# Altium PCB Keyboard_V0.1.PcbDoc (part 1 of 4)
Units mil, origin at the board's own origin, x right, y up, seen from the top; angles counter-clockwise.
Board outline 5480.32 x 4193.11 mil, 2 copper layers (Top Layer, Bottom Layer); 162 components, 142 nets, 755 pads, 487 vias.
Unrouted connection lines stored in the file: 1.
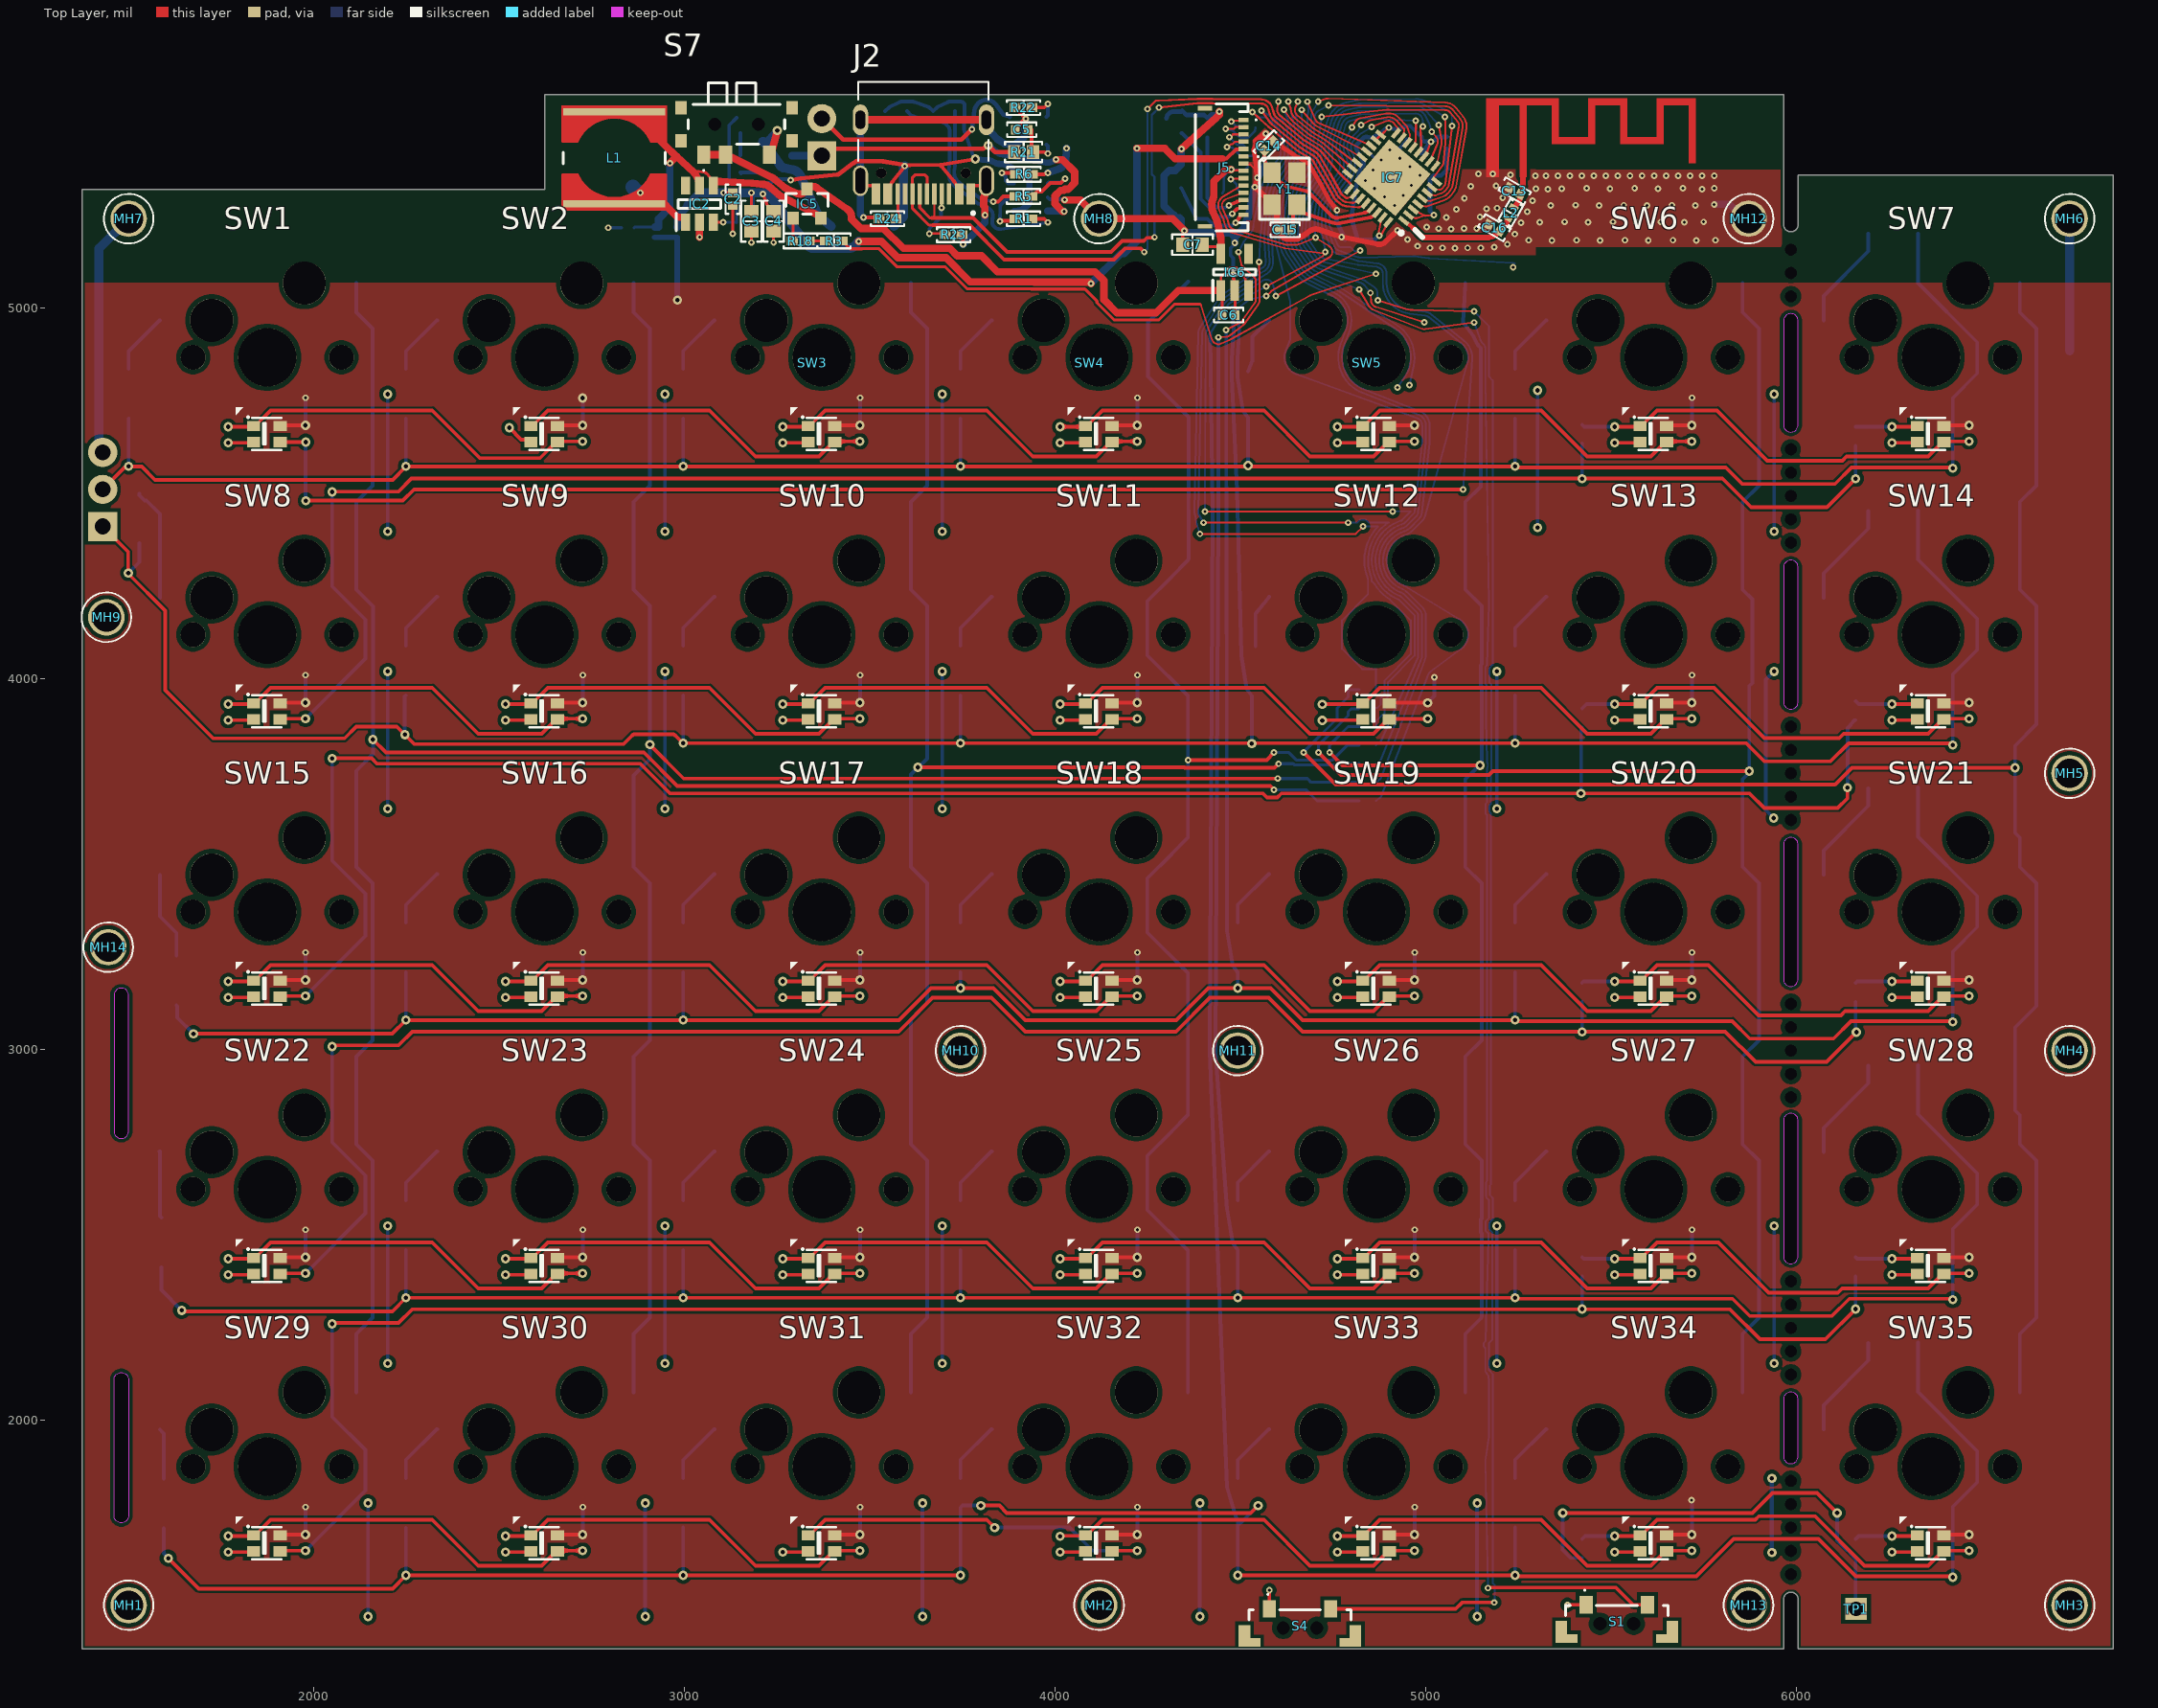
[diagram p0: Top Layer view]
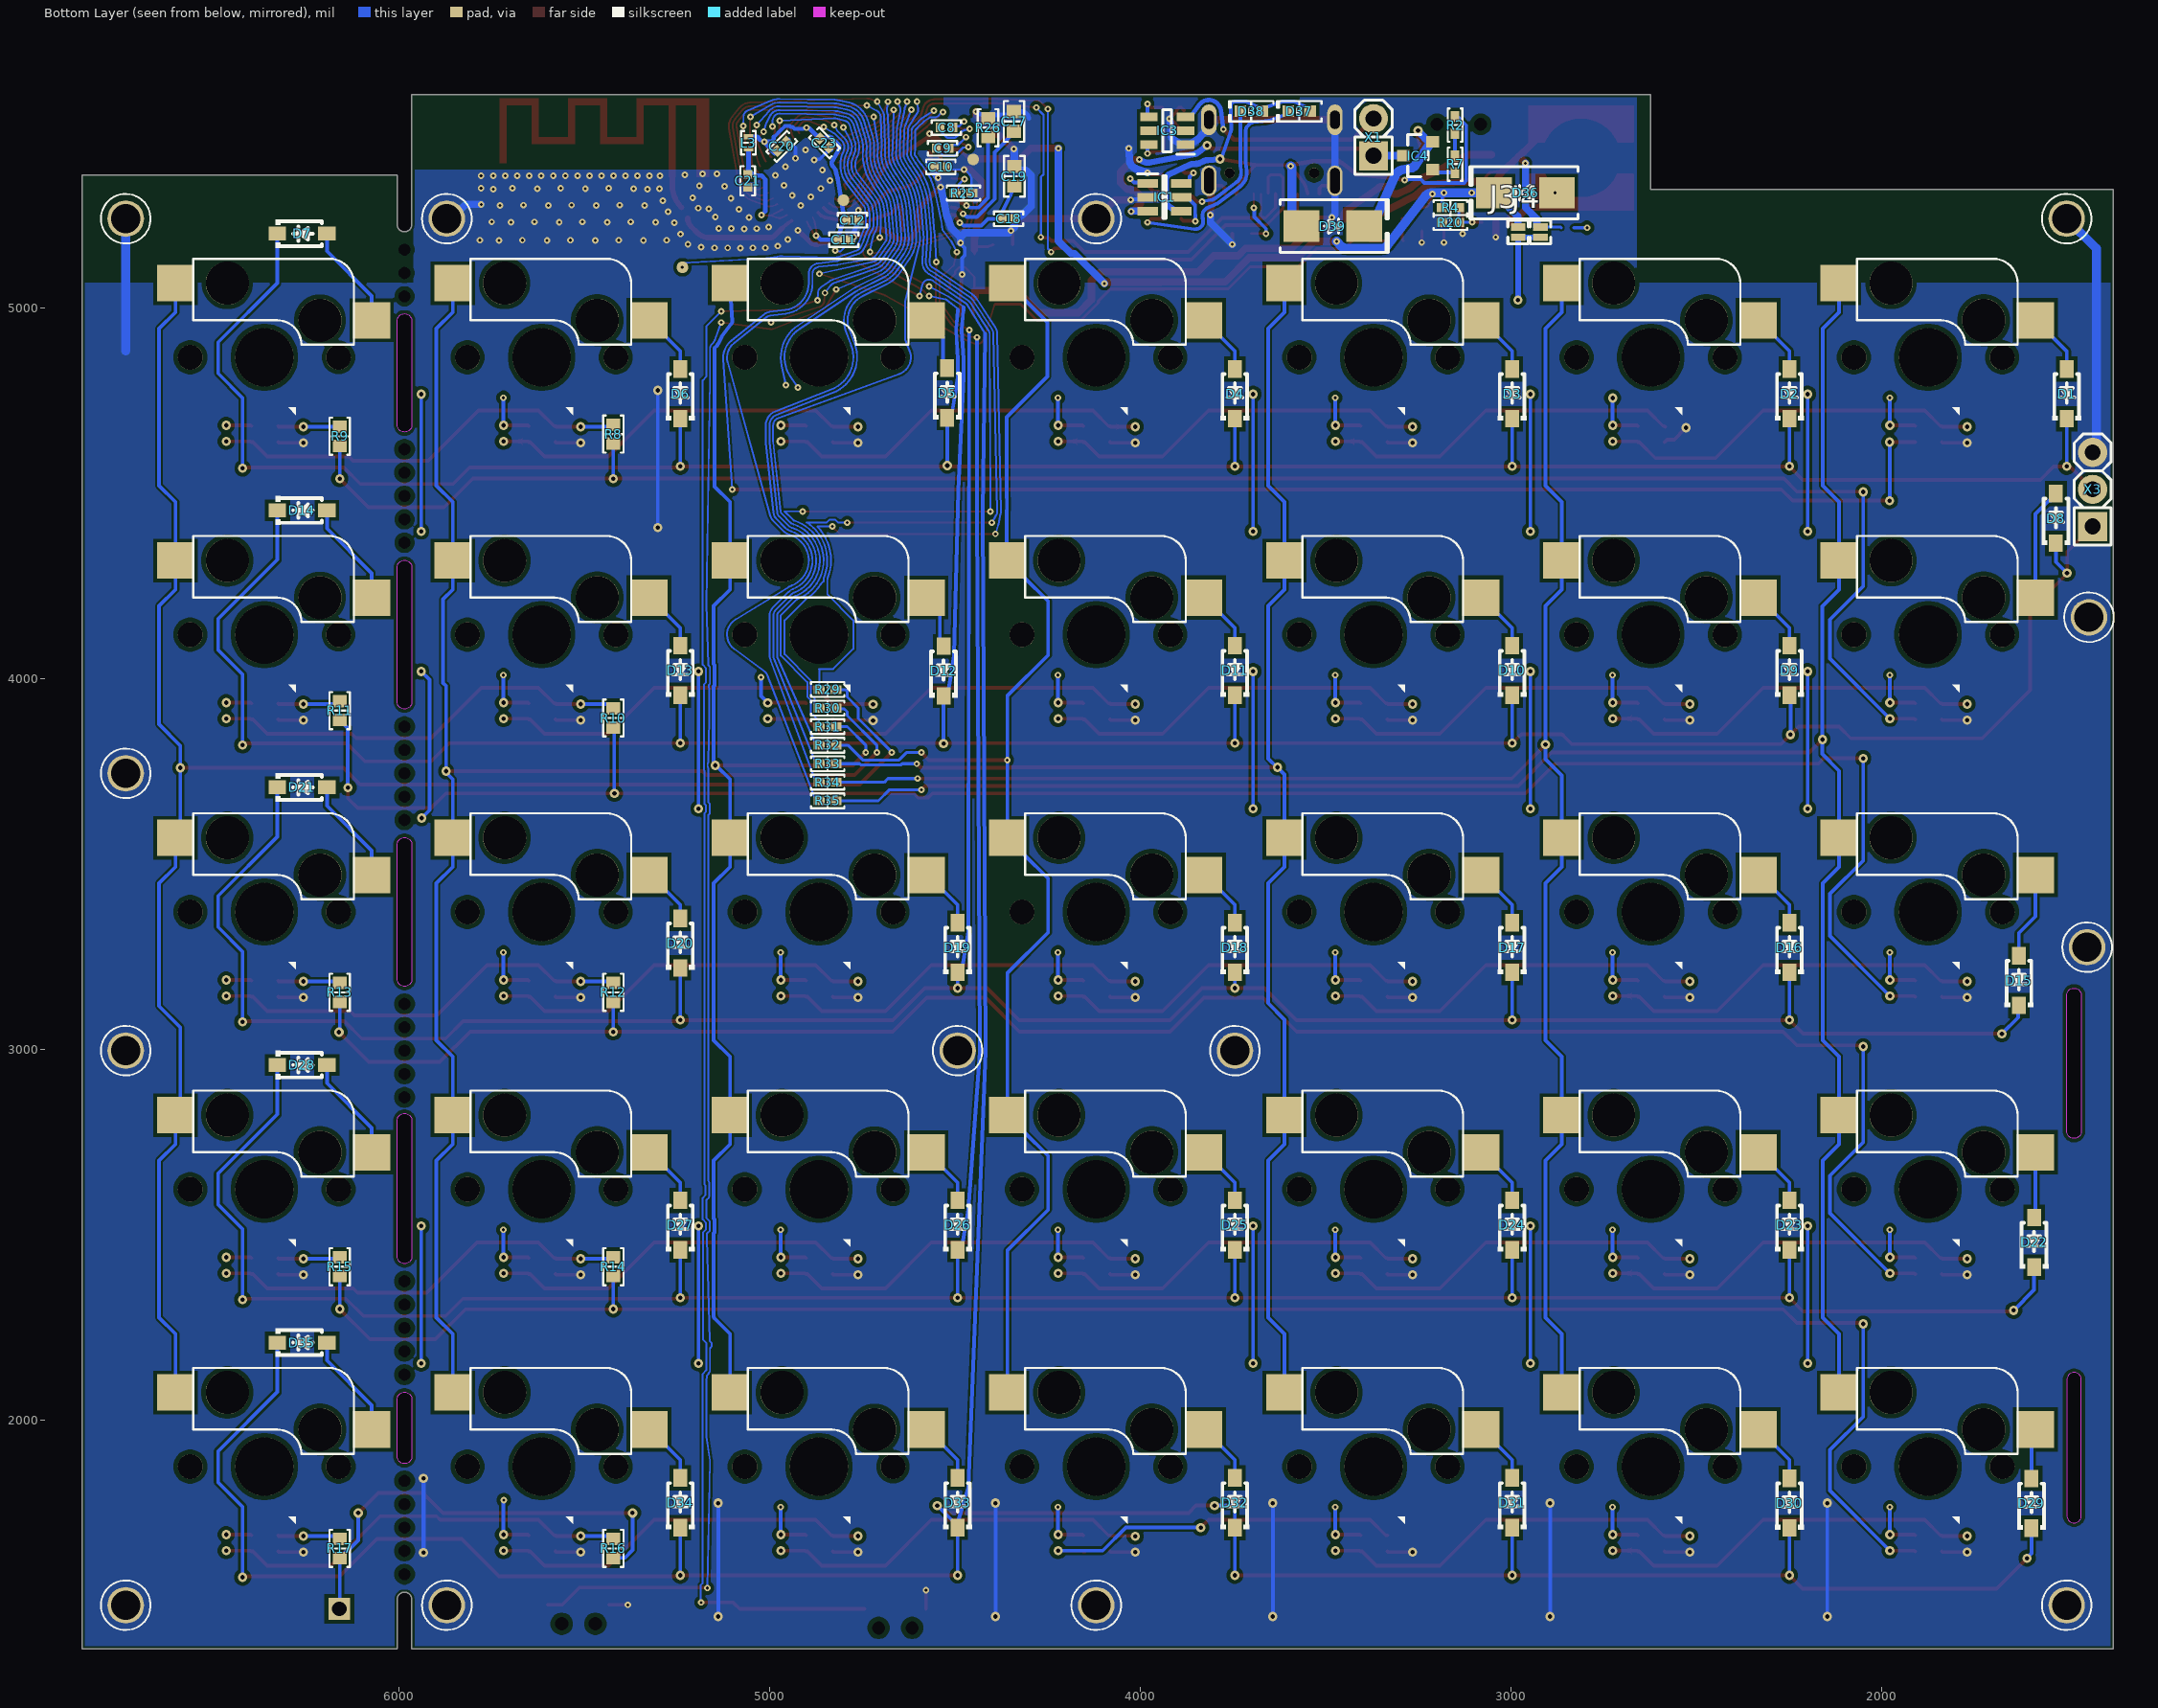
[diagram p1: Bottom Layer view, seen from below]

## Layer stack, top to bottom
Top Solder: solder mask 0.4, Solder Resist, Dk 3.5
Top Layer: signal copper 1.4
Dielectric 1: dielectric 12.6, FR-4, Dk 4.8
Bottom Layer: signal copper 1.4
Bottom Solder: solder mask 0.4, Solder Resist, Dk 3.5

## Board outline
1374.02,1381.89 5964.57,1381.89 5964.57,1515.75 cw(c5984.25,1515.75) 6003.94,1515.75 6003.94,1381.89 6854.33,1381.89 6854.33,5358.27 6003.94,5358.27 6003.94,5224.41 cw(c5984.25,5224.41) 5964.57,5224.41 5964.57,5575 2622.24,5575 2622.24,5319.09 1374.02,5319.09
cut-out: 5964.57,4683.79 ccw(c5983.9,4683.79) 5983.9,4664.46 ccw(c5983.9,4684.5) 6003.94,4684.5 6003.94,4964.22 ccw(c5984.26,4964.22) 5984.26,4983.9 5983.9,4983.9 ccw(c5983.9,4964.57) 5964.57,4964.57
cut-out: 5964.57,1901.22 ccw(c5983.9,1901.22) 5983.9,1881.89 ccw(c5983.9,1901.93) 6003.94,1901.93 6003.94,2055.12 ccw(c5984.26,2055.12) 5984.26,2074.8 5983.9,2074.8 ccw(c5983.9,2055.47) 5964.57,2055.47
cut-out: 5964.57,2440.59 ccw(c5983.9,2440.59) 5983.9,2421.26 ccw(c5983.9,2441.3) 6003.94,2441.3 6003.94,2807.09 ccw(c5984.26,2807.09) 5984.26,2826.77 5983.9,2826.77 ccw(c5983.9,2807.44) 5964.57,2807.44 5964.57,2807.09
cut-out: 5964.57,3188.63 ccw(c5983.9,3188.63) 5983.9,3169.29 ccw(c5983.9,3189.33) 6003.94,3189.33 6003.94,3551.18 ccw(c5984.26,3551.18) 5984.26,3570.86 5983.9,3570.86 ccw(c5983.9,3551.53) 5964.57,3551.53 5964.57,3551.18
cut-out: 5964.57,3936.66 ccw(c5983.9,3936.66) 5983.9,3917.33 5984.26,3917.33 ccw(c5984.26,3937.01) 6003.94,3937.01 6003.94,4299.21 ccw(c5984.26,4299.21) 5984.26,4318.89 5983.9,4318.89 ccw(c5983.9,4299.56) 5964.57,4299.56
cut-out: 1460.63,2778.57 ccw(c1479.96,2778.51) 1479.96,2759.18 ccw(c1479.96,2779.21) 1500,2779.22 1500,3145 ccw(c1480.32,3145) 1480.14,3164.68 ccw(c1479.96,3145.35) 1460.63,3145.35
cut-out: 1460.63,2108.49 cw(c1479.96,2108.49) 1479.96,2127.82 cw(c1479.96,2107.78) 1500,2107.78 1500,1742.11 cw(c1480.32,1742) 1480.14,1722.32 cw(c1479.96,1741.65) 1460.63,1741.65 1460.63,1742

## Design rules (kind name [scope] priority, off if disabled: settings)
BoardOutlineClearance [All] p1: gap=10 ignorepadtopadclearanceinfootprint=FALSE except(0: Arc-SplitContinuation Track-SplitContinuation SMDPad-SplitContinuation THPad-SplitContinuation Via-SplitContinuation Fill-SplitContinuation Poly-SplitContinuation Region-SplitContinuation Text-SplitContinuation; 8: Track-OutlineEdge Fill-OutlineEdge Poly-OutlineEdge)
Clearance [All] p1: gap=6 ignorepadtopadclearanceinfootprint=FALSE except(5: Arc-Arc Arc-Track Arc-SMDPad Arc-Via Track-Track Track-SMDPad Track-Via; 10: SMDPad-Fill SMDPad-Poly SMDPad-Region THPad-Fill THPad-Poly THPad-Region Via-Fill Via-Poly Via-Region Fill-Fill Fill-Poly Fill-Region Poly-Poly Poly-Region Region-Region; 12: Arc-Hole Track-Hole SMDPad-Hole THPad-Hole Via-Hole Fill-Hole Poly-Hole Region-Hole Text-Hole)
PolygonConnect PolygonConnect_2 [All vs IsNamedPolygon('NONET_L02_P-001')] p1: connectstyle=Direct reliefconductorwidth=10 reliefentries=4 polygonreliefangle="90 Angle" airgapwidth=10
PolygonConnect PolygonConnect_1 [All vs IsNamedPolygon('NONET_L02_P-001')] p2: connectstyle=Direct reliefconductorwidth=10 reliefentries=4 polygonreliefangle="90 Angle" airgapwidth=10
PolygonConnect [All] p3: thpad.connectstyle=Relief thpad.reliefconductorwidth=10 thpad.reliefentries=4 thpad.polygonreliefangle="90 Angle" thpad.airgapwidth=10 smdpad.connectstyle=Direct smdpad.reliefconductorwidth=10 smdpad.reliefentries=4 smdpad.polygonreliefangle="90 Angle" smdpad.airgapwidth=10 via.connectstyle=Direct via.reliefconductorwidth=10 via.reliefentries=4 via.polygonreliefangle="90 Angle" via.airgapwidth=10
RoutingVias [All] p1: holewidth=7.87 width=17.72 viastyle="Through Hole" minholewidth=7.87 minwidth=17.72 maxholewidth=30 maxwidth=30
SolderMaskExpansion [All] p1: expansion=4 istentingtop=FALSE
Width [All] p1: maxlimit=40 minlimit=5 preferedwidth=10
30 further rules are at their usual default settings.

## Classes and differential pairs
component class Keyboard_V0.1: C2 C3 C4 C5 C6 C7 C8 C9 C10 C11 C12 C13 C14 C15 C16 C17 C18 C19 C20 C21 C23 D36 D37 D38 D39 IC1 IC2 IC3 IC4 IC5 IC6 IC7 J1 J2 J3 J4 J5 J6 J7 J8 J9 J10 J11 J12 J13 J14 J15 J16 J17 J18 L1 L2 L3 MH1 MH2 MH3 MH4 MH5 MH6 MH7 MH8 MH9 MH10 MH11 MH12 MH13 MH14 R1 R2 R3 R4 R5 R6 R7 R18 R20 R21 R22 R23 R24 R25 R26 R29 R30 R31 R32 R33 R34 R35 S1 S4 S7 TP1 X1 X3 Y1
component class Designator: D1 D2 D3 D4 D5 D6 D7 D8 D9 D10 D11 D12 D13 D14 D15 D16 D17 D18 D19 D20 D21 D22 D23 D24 D25 D26 D27 D28 D29 D30 D31 D32 D33 D34 D35 R8 R9 R10 R11 R12 R13 R14 R15 R16 R17 SW1 SW2 SW3 SW4 SW5 SW6 SW7 SW8 SW9 SW10 SW11 SW12 SW13 SW14 SW15 SW16 SW17 SW18 SW19 SW20 SW21 SW22 SW23 SW24 SW25 SW26 SW27 SW28 SW29 SW30 SW31 SW32 SW33 SW34 SW35

## Components (designator, comment, footprint, x,y, rotation, side; value= is the part's Value field where it differs from the comment)
C2 "1 µF" "CAP 0402_1005" 3130,5292.68 r90 top
C3 "4.7 µF" "CAP 0603_1608" 3180,5233.43 r90 top
C4 "4.7 µF" "CAP 0603_1608" 3240,5233.43 r90 top
C5 "0.1 µF" "CAP 0402_1005" 3909.29,5480 r0 top
C6 "1 µF" "CAP 0402_1005" 4467.32,4980 r180 top
C7 "4.7 µF" "CAP 0603_1608" 4370,5170 r0 top
C8 "1 µF" "CAP 0402_1005" 4522.2,5486.07 r180 bottom
C9 "1 µF" "CAP 0402_1005" 4532.68,5430 r180 bottom
C10 "0.1 µF" "CAP 0402_1005" 4537.32,5380 r180 bottom
C11 "0.1 µF" "CAP 0402_1005" 4798.8,5183.59 r0 bottom
C12 "1 µF" "CAP 0402_1005" 4775.59,5236.22 r0 bottom
C13 "1.5pF" "CAP 0402_1005" 5239.24,5314.82 r330 top
C14 "9 pF" "CAP 0402_1005" 4575.67,5436.57 r45 top
C15 "9 pF" "CAP 0402_1005" 4620,5210 r180 top
C16 "1.5pF" "CAP 0402_1005" 5184.35,5215.81 r330 top
C17 "4.7 µF" "CAP 0603_1608" 4340,5502.52 r270 bottom
C18 "0.1 µF" "CAP 0402_1005" 4354.43,5240 r0 bottom
C19 "4.7 µF" "CAP 0603_1608" 4339,5354.5 r270 bottom
C20 "0.1 µF" "CAP 0402_1005" 4966.44,5435.13 r315 bottom
C21 "1 µF" "CAP 0402_1005" 5058.07,5342.52 r90 bottom
C23 "0.1 µF" "CAP 0402_1005" 4851.29,5444.79 r45 bottom
D1 "1N4148" SOD-123 1500,4767.72 r90 bottom
D2 "1N4148" SOD-123 2248.03,4767.72 r90 bottom
D3 "1N4148" SOD-123 2996.06,4767.72 r90 bottom
D4 "1N4148" SOD-123 3744.09,4767.72 r90 bottom
D5 "1N4148" SOD-123 4520,4770 r90 bottom
D6 "1N4148" SOD-123 5240.16,4767.72 r90 bottom
D7 "1N4148" SOD-123 6260.22,5199.72 r180 bottom
D8 "1N4148" SOD-123 1529.09,4431.66 r90 bottom
D9 "1N4148" SOD-123 2248.03,4021.38 r90 bottom
D10 "1N4148" SOD-123 2996.06,4021.38 r90 bottom
D11 "1N4148" SOD-123 3744.09,4021.38 r90 bottom
D12 "1N4148" SOD-123 4530,4020 r90 bottom
D13 "1N4148" SOD-123 5240.16,4021.38 r90 bottom
D14 "1N4148" SOD-123 6260.22,4453.38 r180 bottom
D15 "1N4148" SOD-123 1629,3185 r90 bottom
D16 "1N4148" SOD-123 2248.03,3274.19 r90 bottom
D17 "1N4148" SOD-123 2996.06,3274.19 r90 bottom
D18 "1N4148" SOD-123 3744.09,3274.19 r90 bottom
D19 "1N4148" SOD-123 4492.13,3274.19 r90 bottom
D20 "1N4148" SOD-123 5240.17,3286 r90 bottom
D21 "1N4148" SOD-123 6260.22,3706.19 r180 bottom
D22 "1N4148" SOD-123 1588,2479 r90 bottom
D23 "1N4148" SOD-123 2248.03,2525.26 r90 bottom
D24 "1N4148" SOD-123 2996.06,2525.26 r90 bottom
D25 "1N4148" SOD-123 3744.09,2525.26 r90 bottom
D26 "1N4148" SOD-123 4492.13,2525.26 r90 bottom
D27 "1N4148" SOD-123 5240.16,2525.26 r90 bottom
D28 "1N4148" SOD-123 6260.22,2957.26 r180 bottom
D29 "1N4148" SOD-123 1595,1775 r90 bottom
D30 "1N4148" SOD-123 2248.03,1775.59 r90 bottom
D31 "1N4148" SOD-123 2996.06,1776.49 r90 bottom
D32 "1N4148" SOD-123 3744.09,1776.49 r90 bottom
D33 "1N4148" SOD-123 4492.13,1776.49 r90 bottom
D34 "1N4148" SOD-123 5240.16,1776.49 r90 bottom
D35 "1N4148" SOD-123 6260.22,2208.49 r180 bottom
D36 "SS24" "DO214AA SMB" 2960,5310 r0 bottom
D37 "Green" "LED 0603_1608 GREEN" 3570.47,5530 r0 bottom
D38 "Red" "LED 0603_1608 RED" 3700,5530 r0 bottom
D39 "SS24" "DO214AA SMB" 3480,5220 r180 bottom
IC1 "TP4057-42-SOT26-R" SOT95P280X125-6N 3934,5298 r180 bottom
IC2 "MT3608" SOT95P280X145-6N 3040,5280 r90 top
IC3 "FS312MH-S" SOT95P280X145-6N 3926.65,5477.4 r0 bottom
IC4 "DMP1045U-7" "DIODES SOT-23-3" 3250,5410 r0 bottom
IC5 "DMP1045U-7" "DIODES SOT-23-3" 3330,5280.63 r90 top
IC6 "ME6211C33M5G-N" SOT95P270X145-5N 4484,5096 r90 top
IC7 "ESP32-C3" QFN50P500X500X90-33N-D 4908.77,5350.75 r140 top
J2 "TYPE-C-31-M-12" HRO_TYPE-C-31-M-12 3644.08,5507 r180 top
J3 "" "CON: JUMPER x1" 2980,5190 r90 bottom
J4 "" "CON: JUMPER x1" 2920,5190 r90 bottom
J5 "5034801400" 5034801400 4448.82,5378.94 r270 top
L1 "3.3 µH" "BOURNS SRR6028" 2810,5404.02 r270 top
L2 "2.7 nH" "Murata LQG15 0402" 5228.75,5256.1 r60 top
L3 "2.7 nH" "Murata LQG15 0402" 5056.1,5444.88 r270 bottom
MH1 "MountingHole" Hole_2.5mm 1500,1500 r0 top
MH2 "MountingHole" Hole_2.5mm 4118.19,1500 r0 top
MH3 "MountingHole" Hole_2.5mm 6736.22,1500 r0 top
MH4 "MountingHole" Hole_2.5mm 6736.22,2996.06 r0 top
MH5 "MountingHole" Hole_2.5mm 6736.22,3744.09 r0 top
MH6 "MountingHole" Hole_2.5mm 6736.22,5240.16 r0 top
MH7 "MountingHole" Hole_2.5mm 1500,5240.16 r0 top
MH8 "MountingHole" Hole_2.5mm 4118.03,5240.16 r0 top
MH9 "MountingHole" Hole_2.5mm 1440,4165 r180 top
MH10 "MountingHole" Hole_2.5mm 3743.9,2995.9 r0 top
MH11 "MountingHole" Hole_2.5mm 4491.9,2996.06 r0 top
MH12 "MountingHole" Hole_2.5mm 5870.08,5240.16 r0 top
MH13 "MountingHole" Hole_2.5mm 5870.08,1500 r0 top
MH14 "MountingHole" Hole_2.5mm 1445,3275 r270 top
R1 "5.6 kOhms" "RES 0402_1005" 3914.41,5240 r180 top
R2 "5.6 kOhms" "RES 0402_1005" 3150,5492.64 r90 bottom
R3 "5.6 kOhms" "RES 0402_1005" 3402.64,5180 r0 top
R4 "5.6 kOhms" "RES 0402_1005" 3162.64,5270 r0 bottom
R5 "5.6 kOhms" "RES 0402_1005" 3914.41,5300 r0 top
R6 "1 kOhms" "RES 0402_1005" 3915.59,5360 r0 top
R7 "5.6 kOhms" "RES 0402_1005" 3150,5387.36 r90 bottom
R8 "Value" "RES 0603_1608" 5420.9,4658.9 r270 bottom
R9 "Value" "RES 0603_1608" 6158.9,4653.31 r270 bottom
R10 "Value" "RES 0603_1608" 5420.9,3893.31 r270 bottom
R11 "Value" "RES 0603_1608" 6158.9,3913.31 r270 bottom
R12 "Value" "RES 0603_1608" 5420.9,3153.31 r270 bottom
R13 "Value" "RES 0603_1608" 6158.9,3153.31 r270 bottom
R14 "Value" "RES 0603_1608" 5420.9,2413.31 r270 bottom
R15 "Value" "RES 0603_1608" 6158.9,2413.31 r270 bottom
R16 "Value" "RES 0603_1608" 5420.9,1653.31 r270 bottom
R17 "Value" "RES 0603_1608" 6158.9,1653.31 r270 bottom
R18 "5.6 kOhms" "RES 0402_1005" 3312.64,5180 r0 top
R20 "1 kOhms" "RES 0402_1005" 3162.64,5230 r180 bottom
R21 "100 Ohms" "RES 0603_1608" 3914.41,5420 r180 top
R22 "1 kOhms" "RES 0402_1005" 3914.41,5540 r0 top
R23 "5.6 kOhms" "RES 0402_1005" 3725.59,5197 r0 top
R24 "5.6 kOhms" "RES 0402_1005" 3547.06,5240.33 r180 top
R25 "5.6 kOhms" "RES 0402_1005" 4476.38,5309.06 r0 bottom
R26 "1 MOhms" "RES 0603_1608" 4410,5485.59 r270 bottom
R29 "5.6 kOhms" "RES 0402_1005" 4842.64,3970 r0 bottom
R30 "5.6 kOhms" "RES 0402_1005" 4842.64,3920 r0 bottom
R31 "5.6 kOhms" "RES 0402_1005" 4842.64,3870 r0 bottom
R32 "5.6 kOhms" "RES 0402_1005" 4842.64,3820 r0 bottom
R33 "5.6 kOhms" "RES 0402_1005" 4842.64,3770 r0 bottom
R34 "5.6 kOhms" "RES 0402_1005" 4842.64,3720 r0 bottom
R35 "5.6 kOhms" "RES 0402_1005" 4842.64,3670 r0 bottom
S1 "TS32-7-35-BK-B-160-RA-SMT-TR" TS32735BKB160RAHSMTTR 5514.72,1441.14 r180 top
S4 "TS32-7-35-BK-B-160-RA-SMT-TR" TS32735BKB160RAHSMTTR 4660,1430 r180 top
S7 "MK-12C02-G020" MK12C02G020 3140,5510 r0 top
SW1 "Kailh" KAILH_MX_SOCKET_WS2812 1874.02,4866.14 r0 top
SW2 "Kailh" KAILH_MX_SOCKET_WS2812 2622.05,4866.14 r0 top
SW3 "Kailh" KAILH_MX_SOCKET_WS2812 3370.08,4866.14 r0 top
SW4 "Kailh" KAILH_MX_SOCKET_WS2812 4118.11,4866.14 r0 top
SW5 "Kailh" KAILH_MX_SOCKET_WS2812 4866.14,4866.14 r0 top
SW6 "Kailh" KAILH_MX_SOCKET_WS2812 5614.17,4866.14 r0 top
SW7 "Kailh" KAILH_MX_SOCKET_WS2812 6362.2,4866.14 r0 top
SW8 "Kailh" KAILH_MX_SOCKET_WS2812 1874.02,4118.11 r0 top
SW9 "Kailh" KAILH_MX_SOCKET_WS2812 2622.05,4118.11 r0 top
SW10 "Kailh" KAILH_MX_SOCKET_WS2812 3370.08,4118.11 r0 top
SW11 "Kailh" KAILH_MX_SOCKET_WS2812 4118.11,4118.11 r0 top
SW12 "Kailh" KAILH_MX_SOCKET_WS2812 4866.14,4118.11 r0 top
SW13 "Kailh" KAILH_MX_SOCKET_WS2812 5614.17,4118.11 r0 top
SW14 "Kailh" KAILH_MX_SOCKET_WS2812 6362.2,4118.11 r0 top
SW15 "Kailh" KAILH_MX_SOCKET_WS2812 1874.02,3370.08 r0 top
SW16 "Kailh" KAILH_MX_SOCKET_WS2812 2622.05,3370.08 r0 top
SW17 "Kailh" KAILH_MX_SOCKET_WS2812 3370.08,3370.08 r0 top
SW18 "Kailh" KAILH_MX_SOCKET_WS2812 4118.11,3370.08 r0 top
SW19 "Kailh" KAILH_MX_SOCKET_WS2812 4866.14,3370.08 r0 top
SW20 "Kailh" KAILH_MX_SOCKET_WS2812 5614.17,3370.08 r0 top
SW21 "Kailh" KAILH_MX_SOCKET_WS2812 6362.2,3370.08 r0 top
SW22 "Kailh" KAILH_MX_SOCKET_WS2812 1874.02,2622.05 r0 top
SW23 "Kailh" KAILH_MX_SOCKET_WS2812 2622.05,2622.05 r0 top
SW24 "Kailh" KAILH_MX_SOCKET_WS2812 3370.08,2622.05 r0 top
SW25 "Kailh" KAILH_MX_SOCKET_WS2812 4118.11,2622.05 r0 top
SW26 "Kailh" KAILH_MX_SOCKET_WS2812 4866.14,2622.05 r0 top
SW27 "Kailh" KAILH_MX_SOCKET_WS2812 5614.17,2622.05 r0 top
SW28 "Kailh" KAILH_MX_SOCKET_WS2812 6362.2,2622.05 r0 top
SW29 "Kailh" KAILH_MX_SOCKET_WS2812 1874.02,1874.02 r0 top
SW30 "Kailh" KAILH_MX_SOCKET_WS2812 2622.05,1874.02 r0 top
SW31 "Kailh" KAILH_MX_SOCKET_WS2812 3370.08,1874.02 r0 top
SW32 "Kailh" KAILH_MX_SOCKET_WS2812 4118.11,1874.02 r0 top
SW33 "Kailh" KAILH_MX_SOCKET_WS2812 4866.14,1874.02 r0 top
SW34 "Kailh" KAILH_MX_SOCKET_WS2812 5614.17,1874.02 r0 top
SW35 "Kailh" KAILH_MX_SOCKET_WS2812 6362.2,1874.02 r0 top
TP1 "LED_out" TESTPOINT_PAD 6160,1490 r180 top
X1 "Connector, 2pin, 2.54mm, 500VAC, 3A" "CON: PLS-2" 3370,5460 r90 bottom
X3 "Connector, 3pin, 2.54mm, 500VAC, 3A" "CON: PLS-3" 1430,4510 r90 bottom
Y1 "40MHz" "ABRACON ABM8G" 4618.11,5320.87 r270 top

## Footprints (in the part's own frame and the unit in brackets; to place one, negate y for a bottom-side part, rotate by r counter-clockwise, add the part's x,y. Pads: shape width x height; smd on the part's side, far side on the other; paste and mask are expansions set on the pad)
5034801400 [mm]
  rect 0.3x0.7 smd: 1(-3.25,1.5) 2(-2.75,1.5) 3(-2.25,1.5) 4(-1.75,1.5) 5(-1.25,1.5) 6(-0.75,1.5) 7(-0.25,1.5) 8(0.25,1.5) 9(0.75,1.5) 10(1.25,1.5) 11(1.75,1.5) 12(2.25,1.5) 13(2.75,1.5) 14(3.25,1.5)
  rect 0.3x1 smd: 15(-4.04,-1.15) 16(4.04,-1.15)
  silkscreen extent -4.35,-1.8 4.35,2.4, body extent -4.35,-1.77 4.35,1.83, height 1.87
"ABRACON ABM8G" [mm] "Crystal, 4-Leads, Body 2.50x3.20mm, Pitch 2.20mm, IPC Medium Density"
  rect 1.4x1.2 smd: 1(-1.1,-0.85) 2(1.1,-0.85) 3(1.1,0.85) 4(-1.1,0.85)
  silkscreen extent -2.25,-1.85 2.1,1.7, body extent -1.61,-1.26 1.61,1.26, height 0.6
"BOURNS SRR6028" [mm] "Precision Wire Wound Inductor, 2-Leads, Body 6.80x6.80mm, IPC Medium Density"
  rect 0.5x7 smd: 1(-3.15,0) 2(3.15,0)
  Top Layer region: -3.6,3.6 -1.1,3.6 -1.1,2.5 -1.4,2.4 -1.7,2.1 -1.9,2 -2.1,1.7 -2.3,1.4 -2.5,1 -2.6,0.7 -2.7,0.3 -2.7,0 -3.6,0
  Top Layer region: -3.6,-3.6 -1.1,-3.6 -1.1,-2.5 -1.4,-2.4 -1.7,-2.1 -1.9,-2 -2.1,-1.7 -2.3,-1.4 -2.5,-1 -2.6,-0.7 -2.7,-0.3 -2.7,0 -3.6,0
  Top Layer region: 3.6,-3.6 1.1,-3.6 1.1,-2.5 1.4,-2.4 1.7,-2.1 1.9,-2 2.1,-1.7 2.3,-1.4 2.5,-1 2.6,-0.7 2.7,-0.3 2.7,0 3.6,0
  Top Layer region: 3.6,3.6 1.1,3.6 1.1,2.5 1.4,2.4 1.7,2.1 1.9,2 2.1,1.7 2.3,1.4 2.5,1 2.6,0.7 2.7,0.3 2.7,0 3.6,0
  Top Layer lines w0.1: 1.1,-3.55 1.1,-2.5 ccw(c0,0) 2.731,0 ccw(c0,0) 1.1,2.5 1.1,3.55 ; -1.1,-3.55 -1.1,-2.5 ; -1.1,-2.5 cw(c0,0) -2.731,0 cw(c0,0) -1.1,2.5 ; -1.1,3.55 -1.1,3.248 -1.1,2.5 ; -1.1,2.5 -1.1,2.5
  silkscreen extent -0.4,-3.5 0.4,3.5, body extent -3.4,-3.4 3.4,3.4, height 2.8
"CAP 0402_1005" [mm] "Chip Capacitor, 2-Leads, Body 1.02x0.51mm, IPC Medium Density"
  rect 0.6x0.64 smd: 1(-0.44,0) 2(0.44,0)
  silkscreen extent -1,-0.5 1,0.5, body extent -0.5,-0.26 0.5,0.26, height 0.52
"CAP 0603_1608" [mm] "Chip Capacitor, 2-Leads, Body 1.60x0.80mm, IPC Medium Density"
  rect 0.9x1 smd: 1(-0.675,0) 2(0.675,0)
  silkscreen extent -1.4,-0.7 1.4,0.7, body extent -0.8,-0.41 0.8,0.41, height 0.82
"CON: JUMPER x1" [mm]
  rect 0.5x1 smd: 1(0,0) 2(0.7,0)
  silkscreen extent -0.45,-0.7 1.15,0.7
"CON: PLS-2" [mm]
  rect 2x2 hole 1.1: 1(-1.27,0)
  round 2 hole 1.1: 2(1.27,0)
  silkscreen extent -2.54,-1.27 2.54,1.27, body extent -2.57,-1.28 2.51,1.26, height 8.54
"CON: PLS-3" [mm]
  rect 2x2 hole 1.1: 1(-2.54,0)
  round 2 hole 1.1: 2(0,0) 3(2.54,0)
  silkscreen extent -3.81,-1.27 3.81,1.27, body extent -3.81,-1.27 3.81,1.27, height 8.54
"DIODES SOT-23-3" [mm] "SOT23, 3-Leads, Body 2.90x2.40mm, Pitch 0.95mm, IPC Medium Density"
  rect 0.9x0.8 smd: 1(-1,0.95) 2(-1,-0.95) 3(1,0)
  silkscreen extent -0.7,-1.45 0.7,1.45, body extent -1.41,-1.45 1.41,1.45, height 1.5
"DO214AA SMB" [mm] "Molded Diode, 2-Leads, Body 4.31x3.62mm, IPC Medium Density"
  rect 2.45x2.15 smd: 1(-2.15,0) 2(2.15,0)
  silkscreen extent -3.6,-1.8 3.8,1.8, body extent -2.6,-1.8 2.6,1.8, height 2.4
Hole_2.5mm [mm]
  round 2.5 hole 2: 0(0,0)
  body extent -0.5,-0.5 0.5,0.5, height 0.5
HRO_TYPE-C-31-M-12 [mm]
  rect 0.6x1.45 smd: A1B12(-3.25,5.095) A4B9(-2.45,5.095) B1A12(3.25,5.095) B4A9(2.45,5.095)
  rect 0.3x1.45 smd: A5(-1.25,5.095) A6(-0.25,5.095) A7(0.25,5.095) A8(1.25,5.095) B5(1.75,5.095) B6(0.75,5.095) B7(-0.75,5.095) B8(-1.75,5.095)
  oval 1.05x2.1 hole 0.65 slot 1.75 at 90 deg: S1(-4.32,4.18) S2(4.32,4.18)
  oval 1.05x2.1 hole 0.65 slot 1.25 at 90 deg: S3(-4.32,0) S4(4.32,0)
  round 0.7 hole 0.7 unplated: ""(-2.89,3.65) ""(2.89,3.65)
  silkscreen extent -4.47,-2.6 4.47,6.5, body extent -4.47,-2.6 4.47,5.31, height 3.31
KAILH_MX_SOCKET_WS2812 [mm]
  rect 0.9x0.7 smd paste+0 mask+0.051: 1(-0.942,-4.707) 2(-0.942,-5.807) 3(0.888,-5.807) 4(0.888,-4.707)
  rect 2.55x2.5 smd far side paste+0 mask+0.102: S1(-7.36,2.54) S2(6.09,5.08)
  round 1.7 hole 1.7 unplated paste-2539.97: ""(-5.08,0) ""(5.08,0)
  round 2.95 hole 2.95 unplated paste-2539.97: ""(-3.81,2.54) ""(2.54,5.08)
  round 3.98 hole 3.98 unplated paste-2539.97: ""(0,0)
  silkscreen extent -2.16,-6.36 0.97,-3.43, body extent -7.9,-7.79 7.81,7.81, height 15.49
"LED 0603_1608 GREEN" [mm] "Chip Diode, 2-Leads, Body 1.60x0.80mm, IPC Medium Density"
  rect 0.8x0.8 smd: 1(-0.75,0) 2(0.75,0)
  silkscreen extent -1.52,-0.7 1.52,0.7, body extent -0.8,-0.4 0.8,0.4, height 0.53
"LED 0603_1608 RED" [mm] "Chip Diode, 2-Leads, Body 1.60x0.80mm, IPC Medium Density"
  rect 0.8x0.8 smd: 1(-0.75,0) 2(0.75,0)
  silkscreen extent -1.52,-0.7 1.52,0.7, body extent -0.8,-0.4 0.8,0.4, height 0.53
MK12C02G020 [mm]
  rect 0.9x1.25 smd: 1(-2.25,-2.463) 2(-0.75,-2.463) 3(2.25,-2.463)
  rect 0.8x0.93 smd: 4(-3.8,-1.522) 5(3.8,-1.522) 6(-3.8,0.748) 7(3.8,0.748)
  round 0.45 hole 0.9 unplated: 8(-1.5,-0.388) 9(1.5,-0.388)
  silkscreen extent -3.3,-3.6 3.3,2.46, body extent -3.85,-2.73 3.85,1.72, height 1.4
"Murata LQG15 0402" [mm] "Chip Inductor, 2-Leads, Body 1.00x0.50mm, IPC High Density"
  rect 0.35x0.65 smd: 1(-0.425,0) 2(0.425,0)
  silkscreen extent -0.8,-0.5 0.8,0.5, body extent -0.52,-0.27 0.53,0.28, height 0.55
QFN50P500X500X90-33N-D [mm]
  rect 0.8x0.3 smd: 1(-2.5,1.75) 2(-2.5,1.25) 3(-2.5,0.75) 4(-2.5,0.25) 5(-2.5,-0.25) 6(-2.5,-0.75) 7(-2.5,-1.25) 8(-2.5,-1.75) 17(2.5,-1.75) 18(2.5,-1.25) 19(2.5,-0.75) 20(2.5,-0.25) 21(2.5,0.25) 22(2.5,0.75) 23(2.5,1.25) 24(2.5,1.75)
  rect 0.3x0.8 smd: 9(-1.75,-2.5) 10(-1.25,-2.5) 11(-0.75,-2.5) 12(-0.25,-2.5) 13(0.25,-2.5) 14(0.75,-2.5) 15(1.25,-2.5) 16(1.75,-2.5) 25(1.75,2.5) 26(1.25,2.5) 27(0.75,2.5) 28(0.25,2.5) 29(-0.25,2.5) 30(-0.75,2.5) 31(-1.25,2.5) 32(-1.75,2.5)
  rect 3.75x3.75 smd: 33(0,0)
  silkscreen extent -3.02,2.38 -2.78,2.62, body extent -2.55,-2.55 2.55,2.55, height 0.9
"RES 0402_1005" [mm] "Chip Resistor, 2-Leads, Body 1.0x0.5mm, IPC Medium Density"
  rect 0.75x0.6 smd: 1(-0.575,0) 2(0.575,0)
  silkscreen extent -1.14,-0.51 1.14,0.51, body extent -0.5,-0.25 0.5,0.25, height 0.35
"RES 0603_1608" [mm] "Chip Resistor, 2-Leads, Body 1.60x0.80mm, IPC Medium Density"
  rect 0.85x0.95 smd: 1(-0.65,0) 2(0.65,0)
  silkscreen extent -1.27,-0.7 1.27,0.7, body extent -0.8,-0.4 0.8,0.4, height 0.45
SOD-123 [mm]
  rect 1.2x0.95 smd: 1(-1.7,0) 2(1.7,0)
  silkscreen extent -1.81,-0.98 1.35,0.98
SOT95P270X145-5N [mm]
  rect 1.4x0.6 smd: 1(-1.25,0.95) 2(-1.25,0) 3(-1.25,-0.95) 4(1.25,-0.95) 5(1.25,0.95)
  silkscreen extent -1.95,-1.45 0.2,1.5, body extent -1.35,-1.45 1.35,1.45, height 1.45
SOT95P280X125-6N [mm]
  rect 1.4x0.6 smd: 1(-1.15,0.95) 2(-1.15,0) 3(-1.15,-0.95) 4(1.15,-0.95) 5(1.15,0) 6(1.15,0.95)
  silkscreen extent -1.85,-1.46 0.1,1.6, body extent -1.4,-1.46 1.4,1.46, height 1.25
SOT95P280X145-6N [mm]
  rect 1.2x0.6 smd: 1(-1.25,0.95) 2(-1.25,0) 3(-1.25,-0.95) 4(1.25,-0.95) 5(1.25,0) 6(1.25,0.95)
  silkscreen extent -1.85,-1.45 0.3,1.6, body extent -1.4,-1.45 1.4,1.45, height 1.45
TESTPOINT_PAD [mm]
  rect 1.5x1.5 hole 1: 1(0,0)
TS32735BKB160RAHSMTTR [mm]
  rect 0.9x1.2 smd: 1(2.1,-1.525) 2(-2.1,-1.525)
  rect 0.8x1.5 smd: 3(3.8,0.325) 4(-3.8,0.325)
  rect 0.7x0.6 smd: 5(-3.05,0.775) 6(3.05,0.775)
  round 0.45 hole 0.9 unplated: 7(1.15,-0.225) 8(-1.15,-0.225)
  silkscreen extent -3.5,-2.57 3.5,-0.77, body extent -3.9,-1.93 3.9,1.94, height 3.5

## Part data
C2 C6 C8 C9 C12 C21: library part GMC04X5R105K25NT, "CAP0402 X5R 1UF 10% 25V", Device Package="0402 (1005 Metric)", Manufacturer="Cal-Chip Electronics, Inc.", Operating Temperature="-55°C ~ 85°C", Supplier Part Number 1=4713-GMC04X5R105K25NTCT-ND, Temperature Coefficient=X5R, Tolerance=±10%, Voltage - Rated=25V, Applications="General Purpose", Capacitance="1 µF", ComponentLink1Description=Datasheet, ComponentLink1URL=https://calchip.com/wp-content/uploads/2023/09/GMC-Series-2.pdf, ComponentLink2Description="DigiKey Link", ComponentLink2URL=https://www.digikey.com/en/products/detail/cal-chip-electronics-inc/GMC04X5R105K25NT/23571683, LastUpdated="4/6/2026 7:07:11 PM", Lifecycle Status=Active, Minimum Order=1, Mounting Type="Surface Mount, MLCC", Package / Case="0402 (1005 Metric)", Packaging=TapeAndReel, Part Number=GMC04X5R105K25NT, PartId=62676, Price=0.01, Series=GMC, Size / Dimension="0.039\" L x 0.020\" W (1.00mm x 0.50mm)", Supplier 1=DigiKey, Thickness (Max)="0.022\" (0.55mm)"
C3 C4 C7 C17 C19: library part CL10A475KA8NQNC, "CAP CER 4.7UF 25V X5R 0603", Device Package="0603 (1608 Metric)", Manufacturer="Samsung Electro-Mechanics", Operating Temperature="-55°C ~ 85°C", Supplier Part Number 1=1276-1900-1-ND, Temperature Coefficient=X5R, Tolerance=±10%, Voltage - Rated=25V, Applications="General Purpose", Capacitance="4.7 µF", ComponentLink1Description=Datasheet, ComponentLink1URL=http://www.samsungsem.com/kr/support/product-search/mlcc/CL10A475KA8NQNC.jsp, ComponentLink2Description="DigiKey Link", ComponentLink2URL=https://www.digikey.com/en/products/detail/samsung-electro-mechanics/CL10A475KA8NQNC/3887558, LastUpdated="4/6/2026 7:23:52 PM", Lifecycle Status=Active, Minimum Order=1, Mounting Type="Surface Mount, MLCC", Package / Case="0603 (1608 Metric)", Packaging=TapeAndReel, Part Number=CL10A475KA8NQNC, Part Status=Active, PartId=2349, Price=0.06, Series=CL, Size / Dimension="0.063\" L x 0.031\" W (1.60mm x 0.80mm)", Supplier 1=DigiKey, Thickness (Max)="0.035\" (0.90mm)"
C5 C10 C11 C18 C20 C23: library part C0402C104M3PAC7867, "CAP CER 0.1UF 25V X5R 0402", Device Package="0402 (1005 Metric)", Manufacturer=KEMET, Operating Temperature="-55°C ~ 85°C", Supplier Part Number 1=399-15637-1-ND, Temperature Coefficient=X5R, Tolerance=±20%, Voltage - Rated=25V, Applications="Bypass, Decoupling", Capacitance="0.1 µF", ComponentLink1Description=Datasheet, ComponentLink1URL=https://api.kemet.com/component-edge/download/datasheet/C0402C104M3PAC7867.pdf, ComponentLink2Description="DigiKey Link", ComponentLink2URL=https://www.digikey.com/en/products/detail/kemet/C0402C104M3PAC7867/7390685, LastUpdated="4/6/2026 7:11:09 PM", Lifecycle Status=Active, Minimum Order=1, Mounting Type="Surface Mount, MLCC", Package / Case="0402 (1005 Metric)", Packaging=TapeAndReel, Part Number=C0402C104M3PAC7867, Part Status=Active, PartId=2096, Price=0.01, Series="SMD Comm X5R", Size / Dimension="0.039\" L x 0.020\" W (1.00mm x 0.50mm)", Supplier 1=DigiKey, Thickness (Max)="0.022\" (0.55mm)"
C13 C16: library part 04025U1R5BAT2A, "CAP CER 1.5PF 50V C0G/NP0 0402", Device Package="0402 (1005 Metric)", Manufacturer="AVX Corporation", Operating Temperature="-55°C ~ 125°C", Supplier Part Number 1=478-5992-1-ND, Temperature Coefficient="C0G, NP0", Tolerance=±0.1pF, Voltage - Rated=50V, Applications="RF, Microwave, High Frequency", Capacitance=1.5pF, ComponentLink1Description=Datasheet, ComponentLink1URL=http://datasheets.avx.com/U-Series.pdf, ComponentLink2Description="DigiKey Link", ComponentLink2URL=http://digikey.com/product-detail/en/avx-corporation/04025U1R5BAT2A/478-5992-1-ND/2208917, Features="Ultra Low ESR", LastUpdated="2/8/2022 12:26:58 PM", Lifecycle Status=Active, Minimum Order=1, Mounting Type="Surface Mount, MLCC", Package / Case="0402 (1005 Metric)", Packaging=TapeAndReel, Part Number=04025U1R5BAT2A, Part Status=Active, PartId=1785, Price=0.02, Series=U, Size / Dimension="0.039\" L x 0.020\" W (1.00mm x 0.50mm)", Supplier 1=DigiKey, Thickness (Max)="0.024\" (0.60mm)"
C14 C15: library part GCQ1555C1H9R0BB01D, "CAP CER 9PF 50V C0G/NP0 0402", Device Package="0402 (1005 Metric)", Manufacturer="Murata Electronics", Operating Temperature="-55°C ~ 125°C", Ratings=AEC-Q200, Supplier Part Number 1=490-17523-1-ND, Temperature Coefficient="C0G, NP0", Tolerance=±0.1pF, Voltage - Rated=50V, Applications="RF, Microwave, High Frequency, Automotive", Capacitance="9 pF", ComponentLink1Description=Datasheet, ComponentLink1URL=https://search.murata.co.jp/Ceramy/image/img/A01X/G101/ENG/GCQ1555C1H9R0BB01-01.pdf, ComponentLink2Description="DigiKey Link", ComponentLink2URL=https://www.digikey.com/en/products/detail/murata-electronics/GCQ1555C1H9R0BB01D/7803116, LastUpdated="4/6/2026 7:10:26 PM", Lifecycle Status=Active, Minimum Order=1, Mounting Type="Surface Mount, MLCC", Package / Case="0402 (1005 Metric)", Packaging=TapeAndReel, Part Number=GCQ1555C1H9R0BB01D, Part Status=Active, PartId=12256, Price=0.04, Series=GCQ, Size / Dimension="0.039\" L x 0.020\" W (1.00mm x 0.50mm)", Supplier 1=DigiKey, Thickness (Max)="0.022\" (0.55mm)"
D36 D39: "DIODE SCHOTTKY 40V 2A DO214AA", Current - Average Rectified (Io)=2A, Current - Reverse Leakage @ Vr="400µA @ 40V", Manufacturer="ON Semiconductor", Operating Temperature - Junction="-65°C ~ 125°C", Package / Case="DO-214AA, SMB", Supplier Device Package="DO-214AA (SMB)", Supplier Part Number 1=SS24FSCT-ND, Voltage - DC Reverse (Vr) (Max)=40V, Voltage - Forward (Vf) (Max) @ If="500mV @ 2A", ComponentLink1Description=Datasheet, ComponentLink1URL=https://www.onsemi.com/pub/Collateral/SS29-D.pdf, ComponentLink2Description="DigiKey Link", ComponentLink2URL=http://digikey.com/product-detail/en/on-semiconductor/SS24/SS24FSCT-ND/1626273, Diode Type=Schottky, LastUpdated="2/8/2024 9:26:46 PM", Lifecycle Status=Active, Minimum Order=1, Mounting Type="Surface Mount", Packaging=TapeAndReel, Part Number=SS24, Part Status=Active, PartId=1394, Price=0.10, Series=-, Speed="Fast Recovery =< 500ns, > 200mA (Io)", Supplier 1=DigiKey
D37: library part 5973316507F, "LED GREEN 0603 SMD", Current - Test=20mA, Device Package="0603 (1608 Metric)", Lens Color=1.24mm, Manufacturer=Dialight, Millicandela Rating=34mcd, Supplier Device Package=0603, Supplier Part Number 1=350-4373-1-ND, Voltage - Forward (Vf) (Typ)=2V, Color=Green, ComponentLink1Description=Datasheet, ComponentLink1URL=http://www.dialightsignalsandcomponents.com/Assets/Drawings/2D_Drawings_DrawingDetailedSpec/NewDrawings/C18371C.pdf, ComponentLink2Description="DigiKey Link", ComponentLink2URL=https://www.digikey.com/en/products/detail/dialight/5973316507F/9385428, Configuration=Standard, Height (Max)=1.24mm, LastUpdated="4/5/2026 8:36:38 PM", Lens Style="Round with Domed Top", Lifecycle Status=Active, Minimum Order=1, Mounting Type="Surface Mount", Package / Case="0603 (1608 Metric)", Packaging=TapeAndReel, Part Number=5973316507F, Part Status=Active, PartId=587, Price=0.14, Series=597, Size / Dimension="1.60mm L x 0.80mm W", Supplier 1=DigiKey, Wavelength - Dominant=560nm
D38: library part 5973005507F, "LED RED 0603 SMD", Current - Test=20mA, Device Package="0603 (1608 Metric)", Lens Color=0.68mm, Manufacturer=Dialight, Millicandela Rating=90mcd, Supplier Device Package=0603, Supplier Part Number 1=350-4374-1-ND, Voltage - Forward (Vf) (Typ)=2V, Color=Red, ComponentLink1Description=Datasheet, ComponentLink1URL=http://www.dialightsignalsandcomponents.com/Assets/Drawings/2D_Drawings_DrawingDetailedSpec/NewDrawings/18369A.pdf, ComponentLink2Description="DigiKey Link", ComponentLink2URL=https://www.digikey.com/en/products/detail/dialight/5973005507F/9385429, Configuration=Standard, Height (Max)=0.68mm, LastUpdated="4/5/2026 8:38:00 PM", Lens Size="1.20mm x 0.80mm", Lens Style="Rectangle with Flat Top", Lifecycle Status=Active, Minimum Order=1, Mounting Type="Surface Mount", Package / Case="0603 (1608 Metric)", Packaging=TapeAndReel, Part Number=5973005507F, Part Status=Active, PartId=378, Price=0.09, Series=597, Size / Dimension="1.60mm L x 0.80mm W", Supplier 1=DigiKey, Wavelength - Dominant=630nm
IC1: "Integrated Circuit", Manufacturer_Name="Nanjing Extension Microelectronics", Datasheet Link=https://datasheet.lcsc.com/szlcsc/Nanjing-Extension-Microelectronics-TP4057_C12044.pdf, Height=1.25mm, Manufacturer_Part_Number=TP4057-42-SOT26-R
IC2: "Integrated Circuit", Manufacturer_Name=Aerosemi, Datasheet Link=https://www.olimex.com/Products/Breadboarding/BB-PWR-3608/resources/MT3608.pdf, Height=1.45mm, Manufacturer_Part_Number=MT3608
IC3: "Integrated Circuit", Manufacturer_Name="Fortune Semiconductor Corporation", Datasheet Link=http://honigreporter.de/tmp/FS312MH-DS-11_EN.pdf, Height=1.45mm, Manufacturer_Part_Number=FS312MH-S
IC4 IC5: "MOSFET P-CH 12V 4A SOT23", Current - Continuous Drain (Id) @ 25°C="4A (Ta)", Drain to Source Voltage (Vdss)="12 V", Drive Voltage (Max Rds On,  Min Rds On)="1.8V, 4.5V", Input Capacitance (Ciss) (Max) @ Vds="1357 pF @ 10 V", Manufacturer="Diodes Incorporated", Operating Temperature="-55°C ~ 150°C (TJ)", Package / Case="TO-236-3, SC-59, SOT-23-3", Power Dissipation (Max)="800mW (Ta)", Supplier Device Package=SOT-23-3, Supplier Part Number 1=DMP1045U-7DICT-ND, ComponentLink1Description=Datasheet, ComponentLink1URL=https://www.diodes.com/assets/Datasheets/DMP1045U.pdf, ComponentLink2Description="DigiKey Link", ComponentLink2URL=https://www.digikey.com/en/products/detail/diodes-incorporated/DMP1045U-7/4249936, FET Type=P-Channel, Gate Charge (Qg) (Max) @ Vgs="15.8 nC @ 4.5 V", LastUpdated="2/8/2024 9:46:13 PM", Lifecycle Status=Active, Minimum Order=1, Mounting Type="Surface Mount", Packaging=TapeAndReel, Part Number=DMP1045U-7, Part Status=Active, Price=0.07, Rds On (Max) @ Id, Vgs="31mOhm @ 4A, 4.5V", Series=-, Supplier 1=DigiKey, Technology="MOSFET (Metal Oxide)", Vgs (Max)=±8V, Vgs(th) (Max) @ Id="1V @ 250µA"
IC6: "Integrated Circuit", Manufacturer_Name=Microne, Datasheet Link=https://datasheet.lcsc.com/szlcsc/1811131510_MICRONE-Nanjing-Micro-One-Elec-ME6211C33M5G-N_C82942.pdf, Height=1.45mm, Manufacturer_Part_Number=ME6211C33M5G-N
IC7: "Integrated Circuit", Manufacturer_Name="Espressif Systems", Mouser Part Number=356-ESP32-C3, Datasheet Link=https://www.espressif.com/sites/default/files/documentation/esp32-c3_datasheet_en.pdf, Height=0.9mm, Manufacturer_Part_Number=ESP32-C3, Mouser Price/Stock=https://www.mouser.co.uk/ProductDetail/Espressif-Systems/ESP32-C3?qs=iLbezkQI%252BsiMXe7tMG%252Bo%2FA%3D%3D
J2: "USB Connectors 24 Receptacle 1 8.94*7.3mm RoHS", Package=None, Availability=Unavailable, MF="{'manufacturer': u'HRO Electronics Co., Ltd.'}", MP=TYPE-C-31-M-12, Price=None
J3 J4: library part Jumper_single, CommentText="\"Перемычка\""
J5: "Connector", Manufacturer_Name=Molex, Arrow Part Number=5034801400, Arrow Price/Stock=https://www.arrow.com/en/products/503480-1400/molex?utm_currency=USD&region=nac, Datasheet Link=https://www.molex.com/content/dam/molex/molex-dot-com/products/automated/en-us/salesdrawingpdf/503/503480/5034801400_sd.pdf?inline, Height=2.07mm, Manufacturer_Part_Number=5034801400
L1: library part SRR6028-3R3Y, "FIXED IND 3.3UH 2.5A 28 MOHM SMD", Current - Saturation=2.6A, Current Rating (Amps)="2.5 A", DC Resistance (DCR)="28mOhm Max", Device Package=Nonstandard, Frequency - Self Resonant=45MHz, Inductance Frequency - Test="100 kHz", Manufacturer="Bourns Inc.", Operating Temperature="-40°C ~ 125°C", Q @ Freq="10 @ 7.96MHz", Supplier Part Number 1=118-SRR6028-3R3YCT-ND, Tolerance=±30%, ComponentLink1Description=Datasheet, ComponentLink1URL=https://www.bourns.com/docs/Product-Datasheets/SRR6028.pdf, ComponentLink2Description="DigiKey Link", ComponentLink2URL=https://www.digikey.com/en/products/detail/bourns-inc/SRR6028-3R3Y/1970369, Height - Seated (Max)="0.118\" (3.00mm)", Inductance="3.3 µH", LastUpdated="2/8/2024 9:34:55 PM", Lifecycle Status=Active, Material - Core=Ferrite, Minimum Order=1, Mounting Type="Surface Mount", Package / Case=Nonstandard, Packaging=TapeAndReel, Part Number=SRR6028-3R3Y, Part Status=Active, PartId=57, Price=0.31, Series=SRR6028, Shielding=Shielded, Size / Dimension="0.268\" L x 0.268\" W (6.80mm x 6.80mm)", Supplier 1=DigiKey, Type="Drum Core, Wirewound"
L2 L3: library part LQG15HN2N7S02D, "FIXED IND 2.7NH 800MA 0.1OHM SMD", Current Rating (Amps)="800 mA", DC Resistance (DCR)="100mOhm Max", Device Package="0402 (1005 Metric)", Frequency - Self Resonant=6GHz, Inductance Frequency - Test="100 MHz", Manufacturer="Murata Electronics", Operating Temperature="-55°C ~ 125°C", Q @ Freq="8 @ 100MHz", Supplier Part Number 1=490-1078-1-ND, Tolerance=±0.3nH, ComponentLink1Description=Datasheet, ComponentLink1URL=https://search.murata.co.jp/Ceramy/image/img/P02/JELF243B-0009.pdf, ComponentLink2Description="DigiKey Link", ComponentLink2URL=https://www.digikey.com/en/products/detail/murata-electronics/LQG15HN2N7S02D/584287, Height - Seated (Max)="0.022\" (0.55mm)", Inductance="2.7 nH", LastUpdated="4/5/2026 9:08:15 PM", Lifecycle Status=Active, Material - Core=Air, Minimum Order=1, Mounting Type="Surface Mount", Package / Case="0402 (1005 Metric)", Packaging=TapeAndReel, Part Number=LQG15HN2N7S02D, Part Status=Active, PartId=2923, Price=0.01, Series=LQG15, Shielding=Unshielded, Size / Dimension="0.039\" L x 0.020\" W (1.00mm x 0.50mm)", Supplier 1=DigiKey, Supplier Device Package="0402 (1005 Metric)", Type=Multilayer
R1 R2 R3 R4 R5 R7 R18 R23 R24 R25 R29 R30 R31 R32 R33 R34 R35: library part CR0402-FX-5601GLF, "RES SMD 5.6K OHM 1% 1/16W 0402", Device Package="0402 (1005 Metric)", Manufacturer="Bourns Inc.", Operating Temperature="-55°C ~ 155°C", Power (Watts)="0.063W, 1/16W", Supplier Device Package=0402, Supplier Part Number 1=CR0402-FX-5601GLFCT-ND, Temperature Coefficient=±100ppm/°C, Tolerance=±1%, ComponentLink1Description=Datasheet, ComponentLink1URL=https://www.bourns.com/docs/Product-Datasheets/CR0402.pdf, ComponentLink2Description="DigiKey Link", ComponentLink2URL=https://www.digikey.com/en/products/detail/bourns-inc/CR0402-FX-5601GLF/3783426, Composition="Thick Film", Height - Seated (Max)="0.016\" (0.40mm)", LastUpdated="2/9/2024 8:30:06 PM", Lifecycle Status=Active, Minimum Order=1, Number of Terminations=2, Package / Case="0402 (1005 Metric)", Packaging=CutTape, Part Number=CR0402-FX-5601GLF, Part Status=Active, PartId=6632, Price=0.01, Resistance="5.6 kOhms", Series=CR0402, Size / Dimension="0.039\" L x 0.020\" W (1.00mm x 0.50mm)", Supplier 1=DigiKey
R6 R20 R22: library part CR0402-FX-1001GLF, "RES SMD 1K OHM 1% 1/16W 0402", Device Package="0402 (1005 Metric)", Manufacturer="Bourns Inc.", Operating Temperature="-55°C ~ 155°C", Power (Watts)="0.063W, 1/16W", Supplier Device Package=0402, Supplier Part Number 1=CR0402-FX-1001GLFCT-ND, Temperature Coefficient=±100ppm/°C, Tolerance=±1%, ComponentLink1Description=Datasheet, ComponentLink1URL=https://www.bourns.com/docs/Product-Datasheets/CR0402.pdf, ComponentLink2Description="DigiKey Link", ComponentLink2URL=https://www.digikey.com/en/products/detail/bourns-inc/CR0402-FX-1001GLF/3593181, Composition="Thick Film", Height - Seated (Max)="0.016\" (0.40mm)", LastUpdated="2/9/2024 8:30:06 PM", Lifecycle Status=Active, Minimum Order=1, Number of Terminations=2, Package / Case="0402 (1005 Metric)", Packaging=CutTape, Part Number=CR0402-FX-1001GLF, Part Status=Active, PartId=6619, Price=0.01, Resistance="1 kOhms", Series=CR0402, Size / Dimension="0.039\" L x 0.020\" W (1.00mm x 0.50mm)", Supplier 1=DigiKey
R8 R9 R10 R11 R12 R13 R14 R15 R16 R17: library part RCA06030000ZSEA, "RES SMD 0 OHM JUMPER 1/10W 0603", Device Package="0603 (1608 Metric)", Manufacturer="Vishay Dale", Operating Temperature="-55°C ~ 155°C", Power (Watts)="0.1W, 1/10W", Ratings=AEC-Q200, Supplier Device Package=0603, Supplier Part Number 1=541-2192-1-ND, Tolerance=Jumper, ComponentLink1Description=Datasheet, ComponentLink1URL=http://www.vishay.com/docs/20037/rcae3.pdf, ComponentLink2Description="DigiKey Link", ComponentLink2URL=http://digikey.com/product-detail/en/vishay-dale/RCA06030000ZSEA/541-2192-1-ND/4946845, Composition="Thick Film", Features="Anti-Sulfur, Automotive AEC-Q200", Height - Seated (Max)="0.020\" (0.50mm)", LastUpdated="9/2/2020 1:10:23 AM", Lifecycle Status=Active, Minimum Order=1, Number of Terminations=2, Package / Case="0603 (1608 Metric)", Packaging=TapeAndReel, Part Number=RCA06030000ZSEA, Part Status=Active, PartId=5740, Price=0.01, Series=RCA, Size / Dimension="0.061\" L x 0.033\" W (1.55mm x 0.85mm)", Supplier 1=DigiKey
R21: library part AC0603FR-07100RL, "RES SMD 100 OHM 1% 1/10W 0603", Device Package="0603 (1608 Metric)", Manufacturer=Yageo, Operating Temperature="-55°C ~ 155°C", Power (Watts)="0.1W, 1/10W", Ratings=AEC-Q200, Supplier Device Package=0603, Supplier Part Number 1=YAG3561CT-ND, Temperature Coefficient=±100ppm/°C, Tolerance=±1%, ComponentLink1Description=Datasheet, ComponentLink1URL=https://www.yageo.com/upload/media/product/productsearch/datasheet/rchip/PYu-AC_51_RoHS_L_7.pdf, ComponentLink2Description="DigiKey Link", ComponentLink2URL=https://www.digikey.com/en/products/detail/yageo/AC0603FR-07100RL/5895735, Composition="Thick Film", Features="Automotive AEC-Q200, Moisture Resistant", Height - Seated (Max)="0.022\" (0.55mm)", LastUpdated="4/6/2026 7:43:49 PM", Lifecycle Status=Active, Minimum Order=1, Number of Terminations=2, Package / Case="0603 (1608 Metric)", Packaging=CutTape, Part Number=AC0603FR-07100RL, Part Status=Active, PartId=17348, Price=0.01, Resistance="100 Ohms", Series=AC, Size / Dimension="0.063\" L x 0.031\" W (1.60mm x 0.80mm)", Supplier 1=DigiKey
R26: library part ERJ-3EKF1004V, "RES SMD 1M OHM 1% 1/10W 0603", Device Package="0603 (1608 Metric)", Manufacturer="Panasonic Electronic Components", Operating Temperature="-55°C ~ 155°C", Power (Watts)="0.1W, 1/10W", Ratings=AEC-Q200, Supplier Device Package=0603, Supplier Part Number 1=P1.00MHCT-ND, Temperature Coefficient=±100ppm/°C, Tolerance=±1%, ComponentLink1Description=Datasheet, ComponentLink1URL=https://industrial.panasonic.com/cdbs/www-data/pdf/RDA0000/AOA0000C304.pdf, ComponentLink2Description="DigiKey Link", ComponentLink2URL=https://www.digikey.com/en/products/detail/panasonic-electronic-components/ERJ-3EKF1004V/196033, Composition="Thick Film", Features="Automotive AEC-Q200", Height - Seated (Max)="0.022\" (0.55mm)", LastUpdated="2/9/2024 8:42:00 PM", Lifecycle Status=Active, Minimum Order=1, Number of Terminations=2, Package / Case="0603 (1608 Metric)", Packaging=TapeAndReel, Part Number=ERJ-3EKF1004V, Part Status=Active, PartId=25691, Price=0.01, Resistance="1 MOhms", Series=ERJ-3EK, Size / Dimension="0.063\" L x 0.031\" W (1.60mm x 0.80mm)", Supplier 1=DigiKey
S1 S4: "Switch", Manufacturer_Name="Same Sky", Datasheet Link=https://www.sameskydevices.com/product/resource/ts32.pdf, Height=3.7mm, Manufacturer_Part_Number=TS32-7-35-BK-B-160-RA-SMT-TR
S7: "Switch", Manufacturer_Name="G-Switch Electronic", Datasheet Link=https://www.lcsc.com/datasheet/C963206.pdf?spm=wm.sxq.inf.ggs&lcsc_vid=FFIKVgZXQgRXBVJUQ1FeUF1UR1ENBFFQQgNcUgZWTlUxVlNRTlFeU11SRlBbUDsOAxUeFF5JWBYZEEoBGA4JCwFIFA4DSA%3D%3D, Height=1.45mm, Manufacturer_Part_Number=MK-12C02-G020
SW1 SW2 SW3 SW4 SW5 SW6 SW7 SW8 SW9 SW10 SW11 SW12 SW13 SW14 SW15 SW16 SW17 SW18 SW19 SW20 SW21 SW22 SW23 SW24 SW25 SW26 SW27 SW28 SW29 SW30 SW31 SW32 SW33 SW34 SW35: library part Kailh_hotswap_RGB_WS2812, "Kailh keyboard switch, hotswap rgb ws2812 in 2020 package, dual-side hotswap options + low prifile variant"
TP1: library part TestPoint
X1: library part PLS-2, CurrentMax=3A, Manufacturer=Connfly, VoltageMax=500VAC, CommentText="\"Разъем\"", HelpURL=https://www.chipdip.ru/product/pls-2, Multichannel=2pin, PartNumber=PLS-2, Pitch=2.54mm, TypeConnector=Connector, ValueManufacturerPartNumber="Connector, 2pin, 2.54mm, 500VAC, 3A"
X3: library part PLS-3, CurrentMax=3A, Manufacturer=Connfly, VoltageMax=500VAC, CommentText="\"Разъем\"", HelpURL=https://www.chipdip.ru/product/pls-3, Multichannel=3pin, PartNumber=PLS-3, Pitch=2.54mm, TypeConnector=Connector, ValueManufacturerPartNumber="Connector, 3pin, 2.54mm, 500VAC, 3A"
Y1: library part ABM8G-40.000MHZ-4Y-T3, "CRYSTAL 40.0000MHZ 10PF SMD", Device Package="4-SMD, No Lead", ESR (Equivalent Series Resistance)="50 Ohms", Frequency Stability=±30ppm, Load Capacitance=10pF, Manufacturer="Abracon LLC", Operating Mode=Fundamental, Operating Temperature="-10°C ~ 60°C", Supplier Part Number 1=535-10921-1-ND, ComponentLink1Description=Datasheet, ComponentLink1URL=https://abracon.com/Resonators/ABM8G.pdf, ComponentLink2Description="DigiKey Link", ComponentLink2URL=http://digikey.com/product-detail/en/abracon-llc/ABM8G-40.000MHZ-4Y-T3/535-10921-1-ND/2624254, Frequency=40MHz, Frequency Tolerance=±30ppm, Height - Seated (Max)="0.039\" (1.00mm)", LastUpdated="3/19/2020 10:36:25 PM", Lifecycle Status=Active, Minimum Order=1, Mounting Type="Surface Mount", Package / Case="4-SMD, No Lead", Packaging=TapeAndReel, Part Number=ABM8G-40.000MHZ-4Y-T3, Part Status=Active, PartId=336, Price=0.39, Series=ABM8G, Size / Dimension="0.126\" L x 0.098\" W (3.20mm x 2.50mm)", Supplier 1=DigiKey, Type="MHz Crystal"

## Free pads (board coordinates)
  round 0 hole 31.5: 7(5984.25,1583.58) 7(5984.25,1646.57) 7(5984.25,1709.56) 7(5984.25,1772.55) 7(5984.25,1835.54) 7(5984.25,2122.05) 7(5984.25,2185.04) 7(5984.25,2248.03) 7(5984.25,2311.02) 7(5984.25,2374.02) 7(5984.25,2870.08) 7(5984.25,2933.07) 7(5984.25,2996.06) 7(5984.25,3059.06) 7(5984.25,3122.05) 7(5984.25,3618.11) 7(5984.25,3681.1) 7(5984.25,3744.09) 7(5984.25,3807.09) 7(5984.25,3870.08) 7(5984.25,4366.14) 7(5984.25,4429.13) 7(5984.25,4492.13) 7(5984.25,4555.12) 7(5984.25,4618.11) 7(5984.25,5030.6) 7(5984.25,5093.59) 7(5984.25,5156.58)
  round 31.5 smd far side paste+0 mask+2: 8(4450,5400) 8(4800,5290) 8(5234.33,5109.07)

## Via types
v1: diameter 25, hole 12, Top Layer to Bottom Layer, tented both sides, 244 vias
v2: diameter 17.72, hole 7.87, Top Layer to Bottom Layer, tented both sides, 242 vias
v3: diameter 17.72, hole 7.87, Top Layer to Bottom Layer, 1 vias

## Nets (pads, with @x,y where several pads share a name; then routed paths per layer and width w, separated by ;. In a path a pad name is that pad's centre, name@x,y a point inside that pad or via, vN(x,y) a via of type N, cw(c..) or ccw(c..) an arc to the next point about the centre after c; other vN are vias at no path point)
3V3: C7.2 C10.2 C11.2 C12.2 C20.2 C23.2 IC6.5 IC7.11 IC7.17 IC7.18 IC7.31 IC7.32 J5.8 L3.1 pad.8@4450,5400 pad.8@4800,5290 R25.1 | length 1299.3
  Top Layer w5: v2(4874.02,5194.51) 4872.82,5200.06 cw(c4877.71,5201.12) 4872.71,5201.09 4872.71,5204.71 cw(c4877.71,5204.71) 4872.78,5205.57 4877.29,5231.38 IC7.31@4883.2,5243.72
  Top Layer w6: v2(4474.22,5372.61) 4475.98,5370.85 4506.12,5370.85 J5.8@4507.87,5369.09 ; IC7.18@4865,5451.72 4865,5452.93 4877.66,5465.58 IC7.17@4877.66,5466.8 4880.27,5466.8 v2(4899.24,5485.76) ; v2(4874.02,5194.51) 4877.3,5196.13 ccw(c4874.63,5201.51) 4879.79,5198.44 4892.31,5219.44 IC7.32@4898.28,5231.07 ; IC7.11@4994.65,5407.17 4998.09,5408.42 5000.72,5418.72 5002.65,5421.02 ccw(c4994.22,5428.09) 5004.5,5424.17 v2(5013.63,5448.08)
  Top Layer w8: C7.2@4396.57,5170 4410.29,5164.34 4438.79,5164.34 4446.6,5156.53 IC6.5@4446.6,5145.21
  Top Layer w20: IC6.5@4446.6,5156.53 4446.6,5162.77 4446.6,5180.26 4446.6,5184.28 ccw(c4426.6,5184.34) 4446.2,5188.3 4437.92,5228.79 ccw(c4423.23,5225.79) 4436.58,5232.63 cw(c4452.2,5240.52) 4436.34,5233.12 4435.69,5234.51 cw(c4451.55,5241.91) 4435.5,5234.94 4425.62,5257.68 cw(c4467.75,5275.98) 4425.3,5293.55 4426.15,5295.58 ccw(c4407.67,5303.23) 4427.67,5303.23 4427.67,5340.67 4459.62,5372.62 v2(4474.22,5372.61)
  Bottom Layer w5: v2(4874.02,5194.51) v2@4875.81,5193.56
  Bottom Layer w6: R25.1@4450.79,5309.06 4454.82,5317.87 4454.82,5346.68 cw(c4473.76,5346.68) 4459.67,5359.33 4469.81,5370.62 cw(c4474.28,5366.61) v2(4474.22,5372.61) ; v2@4474.27,5372.61 4511.19,5372.61 C10.2@4520,5380 ; v2@4872.71,5193.19 v2@4874.6,5191.3
  Bottom Layer w10: 4909.04,5482.67 4931.55,5482.67 4936.77,5487.89 4942.43,5487.89 4944.9,5490.37 4957.42,5490.37 4961.12,5486.67 ; 4961.13,5486.67 4968.26,5479.54 4986.69,5461.11 ; 4988.1,5455.35 4995.13,5448.32
  Bottom Layer w12: C11.2@4816.12,5183.59 4814.19,5190.18 4800.05,5238.32 4798.72,5242.82 4815.07,5346.71 cw(c4836.74,5343.3) 4815.73,5349.58 4817.83,5356.61 ccw(c4733.04,5381.98) 4819.73,5364.16 4820.72,5369 cw(c4832.48,5366.58) 4822.82,5373.7 4829.44,5382.69 ccw(c4819.78,5389.81) 4831.78,5389.81 ; C11.2@4821.94,5183.59 4861.56,5183.59 4872.48,5194.51 v2(4874.02,5194.51) ; 4831.78,5389.86 ccw(c4819.78,5389.81) 4830.22,5395.72 4812.2,5427.7 cw(c4821.78,5433.1) 4814.02,5440.9 4830.72,5457.6 cw(c4838.48,5449.8) 4840.76,5460.56 4854.76,5457.6 4862.98,5463.58 4872,5463.58 v2@4893.09,5484.67 ; C20.2@4985.24,5416.34 4998.13,5429.23 ccw(c4989.6,5437.67) 4998.88,5430.07 v2(5013.63,5448.08) ; 4988.1,5455.35 4988.1,5461.11 ; 4995.13,5448.32 v2@5014.83,5448.32 ; 5024.28,5452.58 5032.43,5460.72 5055.21,5460.72 L3.1@5056.1,5461.61
+4V: C2.2 C3.2 C4.2 D36.2 J3.2 J5.5 R4.2 | length 2189
  Top Layer w8: v2(3105.15,5310) C2.2@3130,5310 ; C3.2@3180,5270 v2(3180,5310) ; v2(3210.94,5307.02) 3224.31,5273.72 C4.2@3240,5270
  Top Layer w10: 4450,5402.04 4462.19,5402.04 4487.4,5427.24 4506.97,5427.24 J5.5@4507.87,5428.15
  Top Layer w20: v2(3469.54,5178.89) 3531.11,5178.89 3575,5135 3705,5135 3770,5070 3942.13,5070 3942.91,5069.23 4091.89,5069.23 v2(4095.88,5065.24) ; v2(4220,5430) 4296,5430 ; 4296,5429.02 4322.98,5402.04 4450,5402.04
  Bottom Layer w8: v2(3180,5310) 3182.34,5307.66 cw(c3176.69,5302) 3184.69,5302 3184.69,5277.81 R4.2@3185.28,5270
  Bottom Layer w20: J3.2@2980,5217.56 2980.33,5217.56 2980.49,5217.72 2980.49,5245.84 3006.42,5271.77 3006.42,5277.68 3038.74,5310 D36.2@3044.65,5310 ; v2(4095.88,5065.24) 4176.86,5146.21 4186.21,5146.21 4220,5180 v2(4220,5430)
  Bottom Layer w25: D36.2@3044.65,5310 v2(3105.15,5310) v2(3180,5310) 3210.94,5310 cw(c3210.94,5285) 3230.73,5300.27 3333.26,5167.01 ccw(c3347.13,5177.68) 3347.13,5160.18 3443.58,5160.18 ccw(c3443.58,5177.68) 3455.94,5165.28 v2(3469.54,5178.89)
BAT+: IC1.3 IC4.3 R21.2 X1.1 | length 1077.8
  Top Layer w12: X1.1@3370,5410 3403.37,5429 3805.92,5429 3815.11,5438.19 v1(3818.62,5438.19) 3836.81,5420 R21.2@3888.82,5420
  Top Layer w17: X1.1@3364.46,5404.46 X1.1@3370,5410
  Top Layer w20: v2(4002.23,5399.44) 4019.06,5399.44 4052.22,5366.29 4052.22,5337.38 4034.29,5319.46 4025.9,5319.46 4023.09,5316.65 4014.21,5316.65 3999.09,5301.53 3999.09,5280.04 4019.49,5259.64 v2(4023.3,5259.64)
  Bottom Layer w17: v1(3818.62,5438.19) 3845.6,5417.48 ccw(c3853.82,5428.19) 3851.36,5414.91 3975.55,5391.91 ccw(c3980,5415.94) 3990.49,5393.87 v2(4002.23,5399.44)
  Bottom Layer w20: IC4.3@3289.37,5410 X1.1@3370,5410 ; IC1.3@3979.28,5260.6 4022.35,5260.6 v2(4023.3,5259.64)
BAT-: IC3.3 X1.2 | length 619.5
  Top Layer w12: X1.2@3370,5510 3423.13,5456.87 ccw(c3431.59,5465.38) 3431.59,5453.38 3747.02,5453.38 v2(3774.97,5481.34)
  Bottom Layer w12: v2(3774.97,5481.34) 3781.78,5532.02 cw(c3814.16,5527.67) 3840.51,5546.97 3859.82,5520.61 IC3.3@3877.44,5514.8
CHIP_EN: IC7.7 | length 1378
  Top Layer w5: v2(4850.01,5040.01) 4851.61,5018.62 ccw(c4870,5020) 4864.36,5002.45 v2(4995.7,4960.27) ; IC7.7@5015.8,5325.19 5028.14,5319.28 5035.65,5318.2 ccw(c5036.72,5325.62) 5042.47,5320.81 5050.06,5329.85 ccw(c5044.31,5334.67) 5051.76,5333.77 v2(5070.6,5490.7)
  Bottom Layer w5: v2(4850.01,5040.01) 4834.07,5060.49 ccw(c4819.52,5049.16) 4825.61,5066.57 4712.86,5104.86 cw(c4728.44,5150.73) 4688.54,5123.27 4662.31,5161.27 cw(c4702.13,5188.84) 4653.87,5192.96 4659.27,5256.26 cw(c4746.46,5248.82) 4659.92,5261.74 4662.31,5277.8 cw(c4759.67,5263.27) 4677.54,5317.53 4689.95,5336.31 ccw(c4594.08,5399.83) 4692.21,5339.86 4701.14,5354.47 ccw(c4603.02,5414.45) 4717.79,5421.66 4717.48,5426.57 cw(c4821.78,5433.1) 4721.86,5463.7 4735.06,5506.75 cw(c4800.48,5486.67) 4784.75,5553.27 4809.36,5559.1 cw(c4825.07,5492.49) 4823.95,5560.92 4971.55,5563.33 cw(c4972.5,5504.9) 4995.42,5558.65 5058.45,5531.78 cw(c5051.22,5514.82) 5069.64,5515.53 v2(5070.6,5490.7)
col1: R29.1 SW7.S2 SW14.S2 SW21.S2 SW28.S2 SW35.S2 | length 5380.3
  Top Layer w10: v2(4670,3800) 4756.65,3713.35 6103.35,3713.35 6148.9,3758.9 v1(6588.9,3758.9)
  Bottom Layer w8: v2(4670,3800) 4670,3802.28 4760,3892.28 4760,3920 4790,3950 4790,3965.31 4794.69,3970 R29.1@4820,3970